# Altium PCB PCB.PcbDoc (part 2 of 3)
Units mm, origin at the board's own origin, x right, y up, seen from the top; angles counter-clockwise.
Board outline 60 x 50 mm, 4 copper layers (Top Layer, Layer 3, Layer 4, Bottom Layer), stack 0.999 mm thick; 112 components, 71 nets, 399 pads, 37 vias.
Unrouted connection lines stored in the file: 18.
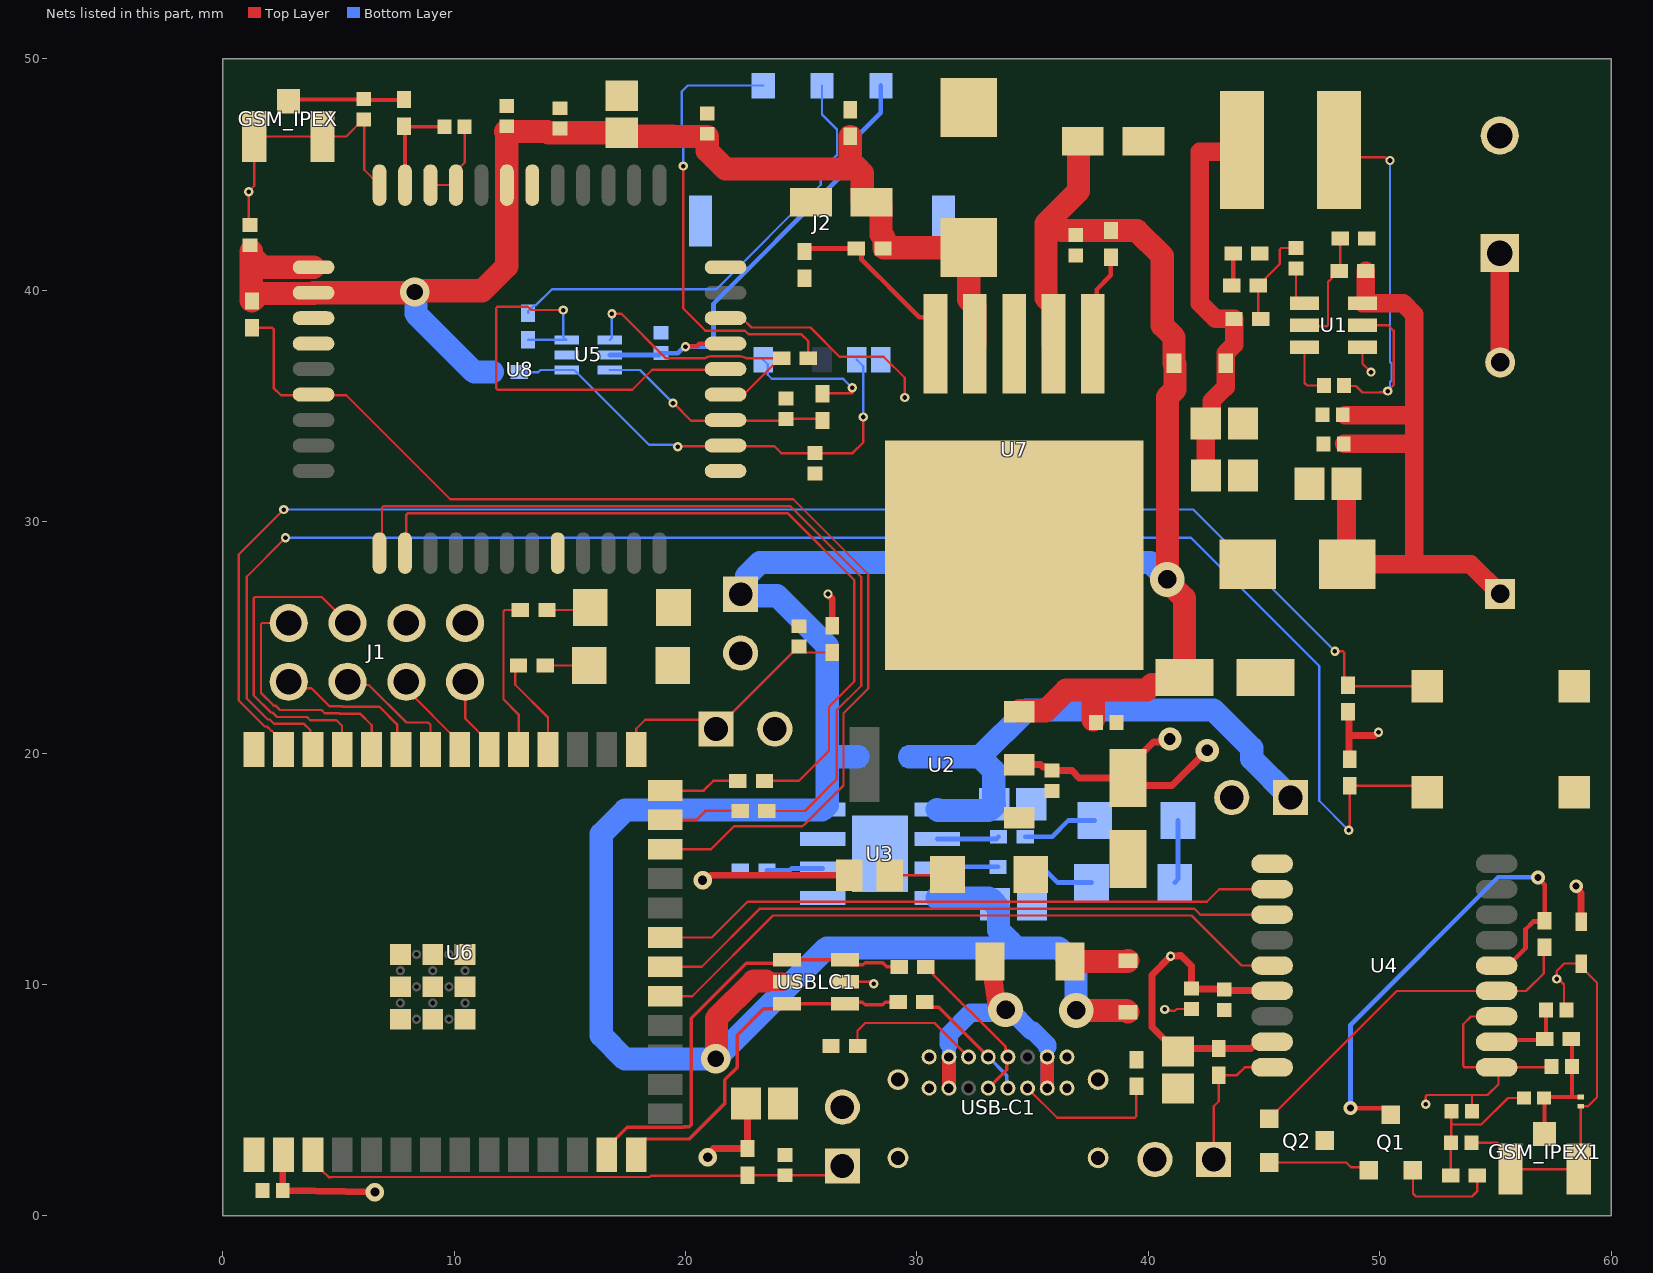
[diagram p4: the nets of this part, all layers, seen from the top]

## Part data (continued)
C22: library part KAM05CT70J475KH, "0402 6.3 V X7T 4.7UF 10%", Device Package="0402 (1005 Metric)", Manufacturer="KYOCERA AVX", Operating Temperature="-55°C ~ 125°C", Ratings=AEC-Q200, Supplier Part Number 1=478-KAM05CT70J475KHCT-ND, Temperature Coefficient=X7T, Tolerance=±10%, Voltage - Rated=6.3V, Applications=Automotive, Capacitance="4.7 µF", ComponentLink1Description=Datasheet, ComponentLink1URL=https://media.digikey.com/pdf/Data%20Sheets/AVX%20PDFs/KAM05CT70J475KH.pdf, ComponentLink2Description="DigiKey Link", ComponentLink2URL=https://www.digikey.com/en/products/detail/kyocera-avx/KAM05CT70J475KH/18685863, lastupdated="06/04/2026 7:09:20 PM", Lifecycle Status=Active, Minimum Order=1, Mounting Type="Surface Mount, MLCC", Package / Case="0402 (1005 Metric)", Packaging=TapeAndReel, Part Number=KAM05CT70J475KH, Part Status=Active, partid=50105, Price=0.05, Series=-, Size / Dimension="0.039\" L x 0.020\" W (1.00mm x 0.50mm)", Supplier 1=DigiKey, Thickness (Max)="0.028\" (0.70mm)"
C23 C24: library part GMC04CG330F50NT, "CAP0402 COG 33PF 1% 50V", Capacitance="33 pF", Part Number=GMC04CG330F50NT
C25 C26: library part GMC04CG470F50NT, "CAP0402 COG 47PF 1% 50V", Device Package="0402 (1005 Metric)", Manufacturer="Cal-Chip Electronics, Inc.", Operating Temperature="-55°C ~ 125°C", Supplier Part Number 1=4713-GMC04CG470F50NTCT-ND, Temperature Coefficient="C0G, NP0", Tolerance=±1%, Voltage - Rated=50V, Applications="General Purpose", Capacitance="47 pF", ComponentLink1Description=Datasheet, ComponentLink1URL=https://calchip.com/wp-content/uploads/2024/02/gmc_series-1.pdf, ComponentLink2Description="DigiKey Link", ComponentLink2URL=https://www.digikey.com/en/products/detail/cal-chip-electronics-inc/GMC04CG470F50NT/22620477, lastupdated="06/04/2026 7:07:18 PM", Lifecycle Status=Active, Minimum Order=1, Mounting Type="Surface Mount, MLCC", Package / Case="0402 (1005 Metric)", Packaging=TapeAndReel, Part Number=GMC04CG470F50NT, partid=63346, Price=0.01, Series=GMC, Size / Dimension="0.039\" L x 0.020\" W (1.00mm x 0.50mm)", Supplier 1=DigiKey, Thickness (Max)="0.022\" (0.55mm)"
C33: library part GMC04CG101F16NT, "CAP0402 COG 100PF 1% 16V", Device Package="0402 (1005 Metric)", Manufacturer="Cal-Chip Electronics, Inc.", Operating Temperature="-55°C ~ 125°C", Supplier Part Number 1=4713-GMC04CG101F16NTCT-ND, Temperature Coefficient="C0G, NP0", Tolerance=±1%, Voltage - Rated=16V, Applications="General Purpose", Capacitance="100 pF", ComponentLink1Description=Datasheet, ComponentLink1URL=https://calchip.com/wp-content/uploads/2024/02/gmc_series-1.pdf, ComponentLink2Description="DigiKey Link", ComponentLink2URL=https://www.digikey.com/en/products/detail/cal-chip-electronics-inc/GMC04CG101F16NT/22577097, lastupdated="06/04/2026 7:07:17 PM", Lifecycle Status=Active, Minimum Order=1, Mounting Type="Surface Mount, MLCC", Package / Case="0402 (1005 Metric)", Packaging=TapeAndReel, Part Number=GMC04CG101F16NT, partid=63248, Price=0.01, Series=GMC, Size / Dimension="0.039\" L x 0.020\" W (1.00mm x 0.50mm)", Supplier 1=DigiKey, Thickness (Max)="0.022\" (0.55mm)"
C34: library part GMC04CG100F16NT, "CAP0402 COG 10PF 1% 16V", Device Package="0402 (1005 Metric)", Manufacturer="Cal-Chip Electronics, Inc.", Operating Temperature="-55°C ~ 125°C", Supplier Part Number 1=4713-GMC04CG100F16NTCT-ND, Temperature Coefficient="C0G, NP0", Tolerance=±1%, Voltage - Rated=16V, Applications="General Purpose", Capacitance="10 pF", ComponentLink1Description=Datasheet, ComponentLink1URL=https://calchip.com/wp-content/uploads/2025/05/GMC-Series-3.pdf, ComponentLink2Description="DigiKey Link", ComponentLink2URL=https://www.digikey.com/en/products/detail/cal-chip-electronics-inc/GMC04CG100F16NT/27783264, Features="General Purpose", lastupdated="06/04/2026 7:06:51 PM", Lifecycle Status=Active, Minimum Order=1, Mounting Type="Surface Mount, MLCC", Package / Case="0402 (1005 Metric)", Packaging=TapeAndReel, Part Number=GMC04CG100F16NT, partid=61390, Price=0.03, Series=GMC, Size / Dimension="0.039\" L x 0.020\" W (1.00mm x 0.50mm)", Supplier 1=DigiKey, Thickness (Max)="0.022\" (0.55mm)"
C36: library part 0402DD105KAT2A, "0402 X5R 1UF10% 35V", Device Package="0402 (1005 Metric)", Manufacturer="KYOCERA AVX", Operating Temperature="-55°C ~ 85°C", Supplier Part Number 1=478-0402DD105KAT2ACT-ND, Temperature Coefficient=X5R, Tolerance=±10%, Voltage - Rated=35V, Applications="General Purpose", Capacitance="1 µF", ComponentLink1Description=Datasheet, ComponentLink1URL=https://datasheets.kyocera-avx.com/cx5r.pdf, ComponentLink2Description="DigiKey Link", ComponentLink2URL=https://www.digikey.com/en/products/detail/kyocera-avx/0402DD105KAT2A/17866333, lastupdated="06/04/2026 7:08:54 PM", Lifecycle Status=Active, Minimum Order=1, Mounting Type="Surface Mount, MLCC", Package / Case="0402 (1005 Metric)", Packaging=TapeAndReel, Part Number=0402DD105KAT2A, Part Status=Active, partid=52378, Price=0.02, Series=-, Size / Dimension="0.039\" L x 0.020\" W (1.00mm x 0.50mm)", Supplier 1=DigiKey
C37: library part TCME337M016R0025E, "330UF (MICRO FARAD)25MOHM @ 100K", Device Package="2917 (7343 Metric)", ESR (Equivalent Series Resistance)="25mOhm @ 100kHz", Lifetime @ Temp.="2000 Hrs @ 125°C", Manufacturer="KYOCERA AVX", Manufacturer Size Code=E, Operating Temperature="-55°C ~ 125°C", Supplier Part Number 1=478-TCME337M016R0025ECT-ND, Tolerance=±20%, Voltage - Rated="16 V", Capacitance="330 µF", ComponentLink1Description=Datasheet, ComponentLink1URL=https://datasheets.kyocera-avx.com/TCM.pdf, ComponentLink2Description="DigiKey Link", ComponentLink2URL=https://www.digikey.com/en/products/detail/kyocera-avx/TCME337M016R0025E/17868563, Features="General Purpose", Height - Seated (Max)="0.169\" (4.30mm)", lastupdated="05/04/2026 8:18:12 PM", Lifecycle Status=Active, Minimum Order=1, Mounting Type="Surface Mount", Package / Case="2917 (7343 Metric)", Packaging=TapeAndReel, Part Number=TCME337M016R0025E, partid=6640, Price=2.44, Series=TCM, Size / Dimension="0.287\" L x 0.169\" W (7.30mm x 4.30mm)", Supplier 1=DigiKey, Type=Molded
D1: "TVS DIODE 15VWM 24.4VC DO214AA", Current - Peak Pulse (10/1000µs)=24.6A, Manufacturer="Littelfuse Inc.", Operating Temperature="-65°C ~ 150°C (TJ)", Package / Case="DO-214AA, SMB", Power - Peak Pulse=600W, Power Line Protection=No, Supplier Device Package="DO-214AA (SMBJ)", Supplier Part Number 1=SMBJ15CALFCT-ND, Voltage - Breakdown (Min)=16.7V, Voltage - Clamping (Max) @ Ipp=24.4V, Voltage - Reverse Standoff (Typ)=15V, Applications="General Purpose", Bidirectional Channels=1, ComponentLink1Description=Datasheet, ComponentLink1URL=https://www.littelfuse.com/~/media/electronics/datasheets/tvs_diodes/littelfuse_tvs_diode_smbj_datasheet.pdf.pdf, ComponentLink2Description="DigiKey Link", ComponentLink2URL=https://www.digikey.com/en/products/detail/littelfuse-inc/SMBJ15CA/285982, lastupdated="05/04/2026 9:01:04 PM", Lifecycle Status=Active, Minimum Order=1, Mounting Type="Surface Mount", Packaging=TapeAndReel, Part Number=SMBJ15CA, Part Status=Active, partid=9087, Price=0.07, Series=SMBJ, Supplier 1=DigiKey, Type=Zener
D2 D6 D7: library part SML-LX1206SRC-TR, "LED RED CLEAR 1206 SMD", Current - Test=20mA, Device Package="1206 (3216 Metric)", Lens Color=Colorless, Manufacturer="Lumex Opto/Components Inc.", Millicandela Rating=25mcd, Supplier Device Package=1206, Supplier Part Number 1=67-1359-1-ND, Voltage - Forward (Vf) (Typ)=1.7V, Color=Red, ComponentLink1Description=Datasheet, ComponentLink1URL=//media.digikey.com/pdf/Data%20Sheets/Lumex%20PDFs/SML-LX1206SRC-TR.pdf, ComponentLink2Description="DigiKey Link", ComponentLink2URL=https://www.digikey.com/en/products/detail/lumex-opto-components-inc/SML-LX1206SRC-TR/229141, Configuration=Standard, Height (Max)=1.10mm, lastupdated="05/04/2026 8:39:22 PM", Lens Size="2.00mm x 1.50mm", Lens Style="Rectangle with Flat Top", Lens Transparency=Clear, Lifecycle Status=Active, Minimum Order=1, Mounting Type="Surface Mount", Package / Case="1206 (3216 Metric)", Packaging=TapeAndReel, Part Number=SML-LX1206SRC-TR, Part Status=Active, partid=224, Price=0.07, Series=-, Size / Dimension="3.20mm L x 1.60mm W", Supplier 1=DigiKey, Viewing Angle=140°, Wavelength - Peak=660nm
D3: library part IN-S126ATG, "LED GREEN CLEAR 1206 SMD", Current - Test=20mA, Device Package="1206 (3216 Metric)", Lens Color=Colorless, Manufacturer=Inolux, Millicandela Rating=560mcd, Supplier Device Package=1206, Supplier Part Number 1=1830-1089-1-ND, Voltage - Forward (Vf) (Typ)=3.2V, Color=Green, ComponentLink1Description=Datasheet, ComponentLink1URL=http://www.inolux-corp.com/datasheet/SMDLED/Mono%20Color%20Top%20View/IN-S126AT%20Series_V1.0.pdf, ComponentLink2Description="DigiKey Link", ComponentLink2URL=https://www.digikey.com/en/products/detail/inolux/IN-S126ATG/7604905, Configuration=Standard, Height (Max)=1.10mm, lastupdated="05/04/2026 8:37:03 PM", Lens Size="2.00mm x 1.50mm", Lens Style="Rectangle with Flat Top", Lens Transparency=Clear, Lifecycle Status=Active, Minimum Order=1, Mounting Type="Surface Mount", Package / Case="1206 (3216 Metric)", Packaging=TapeAndReel, Part Number=IN-S126ATG, Part Status=Active, partid=552, Price=0.06, Series=IN-S126AT, Size / Dimension="3.20mm L x 1.50mm W", Supplier 1=DigiKey, Viewing Angle=120°, Wavelength - Dominant=520nm, Wavelength - Peak=526nm
D4 D5 D8: library part CMP-1055-00466-1, "Schottky Barrier Diode, 2-Pin SOD-323, Pb-Free, Tape and Reel", Manufacturer="On Semiconductor", ComponentLink1Description="Manufacturer URL", ComponentLink1URL=http://www.onsemi.com/, ComponentLink2Description=Datasheet, ComponentLink2URL=http://www.onsemi.cn/pub_link/Collateral/NSR0320MW2T1-D.PDF, ComponentLink3Description="Package Specification", ComponentLink3URL=http://www.onsemi.com/pub_link/Collateral/477-02.PDF.1, Configuration=Single, DatasheetVersion="Rev. 4", IFSM Max (A)=5, Mounting Technology="Surface Mount", PackageDescription="2-Pin SOD, Body 1.7 x 1.25 mm", PackageReference=SOD-323-2-477-02, PackageVersion="Rev. H, 03/2007", Packing="Tape and Reel", PartNumber=NSR0320MW2T1G, RoHS=TRUE
D9: "TVS DIODE 5VWM 11VC DSN0603-2", Part Number=PESD5V0S1USF,315
D10: "TVS DIODE 3.3VWM 14.1VC SOD523", Part Number=ESD5Z3.3T5G
D11: library part CMD11-21VYC/TR8, "LED YELLOW CLEAR 1206 SMD", Current - Test=20mA, Device Package="1206 (3216 Metric)", Lens Color=1.50mm, Manufacturer="Visual Communications Company - VCC", Millicandela Rating=6mcd, Supplier Device Package=1206, Supplier Part Number 1=28-CMD11-21VYC/TR8CT-ND, Voltage - Forward (Vf) (Typ)=2V, Color=Yellow, ComponentLink1Description=Datasheet, ComponentLink1URL=https://vcclite.com/wp-content/uploads/wpallimport/files/files/CMD11-21%20SMT%20LEDs%201206%20Package%20Size.pdf, ComponentLink2Description="DigiKey Link", ComponentLink2URL=https://www.digikey.com/en/products/detail/visual-communications-company-vcc/CMD11-21VYC-TR8/254830, Configuration=Standard, Height (Max)=1.50mm, lastupdated="05/04/2026 8:40:44 PM", Lens Size="1.10mm Dia", Lens Style="Round with Flat Top", Lens Transparency=Clear, Lifecycle Status=Active, Minimum Order=1, Mounting Type="Surface Mount", Package / Case="1206 (3216 Metric)", Packaging=TapeAndReel, Part Number=CMD11-21VYC/TR8, Part Status=Active, partid=6, Price=0.25, Series=-, Size / Dimension="3.00mm L x 1.50mm W", Supplier 1=DigiKey, Viewing Angle=20°, Wavelength - Peak=585nm
F1: "FUSE BOARD MNT 750MA 63VDC 1206", Breaking Capacity @ Rated Voltage=50A, Current Rating (Amps)=750mA, Device Package="1206 (3216 Metric)", Manufacturer="Vishay Beyschlag", Operating Temperature="-55°C ~ 125°C", Supplier Part Number 1=MFU1206.75CT-ND, Voltage Rating - DC=63V, Approval Agency=UL, Approvals=UL, ComponentLink1Description=Datasheet, ComponentLink1URL=http://www.vishay.com/docs/28747/mfuserie.pdf, ComponentLink2Description="DigiKey Link", ComponentLink2URL=http://digikey.com/product-detail/en/vishay-beyschlag/MFU1206FF00750P100/MFU1206.75CT-ND/1206559, Fuse Type="Board Mount (Cartridge Style Excluded)", lastupdated="02/09/2020 1:30:46 AM", Lifecycle Status=Active, Melting I²t=0.0022, Minimum Order=1, Mounting Type="Surface Mount", Package / Case="1206 (3216 Metric)", Packaging=TapeAndReel, Part Number=MFU1206FF00750P100, Part Status=Active, Price=0.40, Response Time="Fast Blow", Series=MFU, Size / Dimension="0.126\" L x 0.063\" W x 0.022\" H (3.20mm x 1.60mm x 0.55mm)", Supplier 1=DigiKey
F2: library part CMP-08605-000087-1, "FUSE BRD MNT 3A 125VAC/VDC RAD", Case/Package=Radial, Current Rating=3A, DC Cold Resistance=275mR, Max Operating Temperature=90°C, Min Operating Temperature=-55°C, Package Quantity=1000, Voltage Rating (AC)=125V, Approvals=UR, Fuse Current=3A, Height=8mm, Length=0.512inch, Mount="Through Hole", Packaging=Bulk, REACH SVHC="No SVHC", Resistance=275mR, RoHS Compliant=Yes, Series="PICO® 259-UL913", Termination=Radial, Type=Electrical, Voltage Rating (DC)=125V, Width=8mm
GSM_IPEX GSM_IPEX1: library part CMP-2000-05152-3, "CONN U.FL RCPT STR 50 OHM SMD", Dielectric Material=Polymer, Frequency=6GHz, Housing Color=Beige, Insulation Resistance=500MR, Max Operating Temperature=90°C, Min Operating Temperature=-40°C, Package Quantity=2500, Body Material=Bronze, Body Plating=Silver, Connector Type=Coaxial, Contact Material=Brass, Contact Plating=Gold, Depth=3.1mm, Fastening Type=Snap, Gender=Male, Impedance=50R, Lead Free="Lead Free", Length=3mm, Max Frequency=6GHz, Mount="Surface Mount", Orientation=Straight, Packaging="Cut Tape", Radiation Hardening=No, REACH SVHC="No SVHC", Series=U.FL, Termination=Solder, Weight=0.001764oz, Wire/Cable Type=Coaxial
J1: library part 6130XX21121_61300821121, "Connector Header Through Hole 8 position 0.100 (2.54mm)", Package=None, Check_prices=https://www.snapeda.com/parts/61300821121/Wurth+Electronics/view-part/?ref=eda, MF="Wurth Electronics", MP=61300821121, SnapEDA_Link=https://www.snapeda.com/parts/61300821121/Wurth+Electronics/view-part/?ref=snap
J2: "8 (6 + 2) Position Card Connector NANO SIM Surface Mount, Right Angle Gold", Package=None, Availability="In Stock", Check_prices=https://www.snapeda.com/parts/2452808-1/TE+Connectivity/view-part/?ref=eda, MF="TE Connectivity", MP=2452808-1, Price=None, SnapEDA_Link=https://www.snapeda.com/parts/2452808-1/TE+Connectivity/view-part/?ref=snap
L1: library part VLS6045EX-100M, "FIXED IND 10UH 3.4A 61 MOHM SMD", Current - Saturation=3.9A, Current Rating (Amps)="3.4 A", DC Resistance (DCR)=47mOhm, Device Package=Nonstandard, Inductance Frequency - Test="100 kHz", Manufacturer="TDK Corporation", Operating Temperature="-40°C ~ 105°C", Supplier Part Number 1=445-173039-1-ND, Tolerance=±20%, ComponentLink1Description=Datasheet, ComponentLink1URL=https://product.tdk.com/info/en/catalog/datasheets/inductor_commercial_power_vls6045ex_en.pdf?ref_disty=digikey, ComponentLink2Description="DigiKey Link", ComponentLink2URL=https://www.digikey.com/en/products/detail/tdk-corporation/VLS6045EX-100M/5057822, Height - Seated (Max)="0.177\" (4.50mm)", Inductance="10 µH", lastupdated="20/05/2026 2:30:18 PM", Lifecycle Status=Active, Material - Core=Ferrite, Minimum Order=1, Mounting Type="Surface Mount", Package / Case=Nonstandard, Packaging=TapeAndReel, Part Number=VLS6045EX-100M, Part Status=Active, partid=8938, Price=0.14, Series=VLS-EX, Shielding=Shielded, Size / Dimension="0.236\" L x 0.236\" W (6.00mm x 6.00mm)", Supplier 1=DigiKey, Type="Drum Core, Wirewound"
L2: library part CMP-06042-003943-1, "Multilayer type RF Inductor 47nH ±5% 0.72Ω 300mA 0402"
P1: library part "Bornier 2 vis 5.08mm", "Terminal Block Connector Wire Receptacle 2 5.08 mm 30-16 AWG Green 13.5 A 250 V", Package=None, Availability="In Stock", Check_prices=https://www.snapeda.com/parts/282837-2/TE+Connectivity+AMP+Connectors/view-part/?ref=eda, MF="TE Connectivity", MP=282837-2, Price=None, Purchase-URL="https://www.snapeda.com/api/url_track_click_mouser/?unipart_id=2549980&manufacturer=TE Connectivity&part_name=282837-2&search_term=bornier 2 vis 5.08mm", SnapEDA_Link=https://www.snapeda.com/parts/282837-2/TE+Connectivity+AMP+Connectors/view-part/?ref=snap
P2 P3 P4 P5 P6: library part CMP-1024-00064-1, "Low Profile .025\" SQ Post Header, Through-hole, Vertical, -55 to 125 degC, 2.54 mm Pitch, 2-Pin, Male, RoHS", Manufacturer=Samtec, Temperature Range="-55 to 125 degC", ComponentLink1Description="Manufacturer URL", ComponentLink1URL=http://www.samtec.com, ComponentLink2Description=Datasheet, ComponentLink2URL=http://www.samtec.com/documents/webfiles/pdf/MTLW_TH.PDF, ComponentLink3Description="Package Specification", ComponentLink3URL=http://www.samtec.com/documents/webfiles/cpdf/MTLW-1XX-XX-XX-X-XXX-XX-XX-MKT1.pdf, DatasheetVersion=F-214, Mounting Technology=Through-hole, Orientation=Vertical, PackageDescription="Low Profile Terminal Assembly", PackageReference=MTLW-102-05-X-S-172, PackageVersion="T, 6/1991", PartNumber=MTLW-102-05-G-S-172, Pitch="2.54 mm", RoHS=True
Q1: library part CMP-2000-05778-1, "P-Channel MOSFET, 30 V, 4 A, -55 to 150 degC, 3-Pin SOT-23-3L, RoHS, Tape and Reel", Continuous Drain Current=4A, Drain-Source On-Volt=30V, Frequency (Max)=NotRequiredMHz, Gate-Source Voltage (Max)=?12V, Manufacturer="Alpha and Omega", Operating Temp Range=-55Cto150C, Operating Temperature Classification=Military, Output Power (Max)=NotRequiredW, Package Description="3-Pin Small Outline Transistor, Body 2.95 x 1.6 mm, Pitch 0.95 mm", Package Reference=SOT-23-3L, Package Type=SOT-23, Power Dissipation=1.4W, Power Gain=NotRequireddB, Channel Mode=Enhancement, Datasheet URL=http://www.aosmd.com/res/data_sheets/AO3401A.pdf, Datasheet Version="Rev. 3, 03/2011", Drain Current (Max)=4A, Drain Efficiency=NotRequired%, Drain-Source On-Res=0.044ohm, Manufacturer URL=http://www.aosmd.com/, Mounting=SurfaceMount, Mounting Technology=SurfaceMount, Noise Figure=NotRequireddB, Number of  Elements=1, Package URL=http://www.aosmd.com/res/packaging_information/SOT-23-3L.pdf, Pin Count=3, Polarity=P, Rad Hardened=No, Type=PowerMOSFET
Q2: library part CMP-83955-000006-1, "MOSFET N-CH 30V 5.7A SOT23", Case/Package=SOT-23, Continuous Drain Current (ID)=5.7A, Drain to Source Voltage (Vdss)=30V, Gate to Source Voltage (Vgs)=12V, Input Capacitance=630pF, Max Operating Temperature=150°C, Max Power Dissipation=1.4W, Min Operating Temperature=-55°C, Lead Free="Lead Free", Mount="Surface Mount", Number of Elements=1, Number of Pins=3, Packaging="Tape and Reel", Power Dissipation=1.4W, Radiation Hardening=No, Rds On Max=26.5mR
R1 R2 R3 R12 R19 R27 R30 R31: library part TNPU040210K0BZEP00, "TNPU0402 10K 0.1% T-16 EP1 E3", Device Package="0402 (1005 Metric)", Manufacturer="Vishay Dale", Operating Temperature="-55°C ~ 125°C", Power (Watts)="0.063W, 1/16W", Ratings=AEC-Q200, Supplier Device Package=0402, Supplier Part Number 1=541-TNPU040210K0BZEP00CT-ND, Temperature Coefficient=±5ppm/°C, Tolerance=±0.1%, ComponentLink1Description=Datasheet, ComponentLink1URL=http://www.vishay.com/docs/28779/tnpue3.pdf, ComponentLink2Description="DigiKey Link", ComponentLink2URL=https://www.digikey.com/en/products/detail/vishay-dale/TNPU040210K0BZEP00/10668512, Composition="Thin Film", Features="Anti-Sulfur, Automotive AEC-Q200, Moisture Resistant", Height - Seated (Max)="0.016\" (0.40mm)", lastupdated="09/02/2024 8:29:39 PM", Lifecycle Status=Active, Minimum Order=1, Number of Terminations=2, Package / Case="0402 (1005 Metric)", Packaging=TapeAndReel, Part Number=TNPU040210K0BZEP00, Part Status=Active, partid=49938, Price=0.67, Resistance="10 kOhms", Series="TNPU e3", Size / Dimension="0.039\" L x 0.020\" W (1.00mm x 0.50mm)", Supplier 1=DigiKey
R4: library part CPF0402B511KE1, "CPF 0402 511K 0.1% 25PPM 1K RL", Device Package="0402 (1005 Metric)", Manufacturer="TE Connectivity Passive Product", Operating Temperature="-55°C ~ 155°C", Power (Watts)="0.063W, 1/16W", Supplier Device Package=0402, Supplier Part Number 1=1712-CPF0402B511KE1CT-ND, Temperature Coefficient=±25ppm/°C, Tolerance=±0.1%, ComponentLink1Description=Datasheet, ComponentLink1URL=https://www.te.com/commerce/DocumentDelivery/DDEController?Action=srchrtrv&DocNm=1773200&DocType=DS&DocLang=English, ComponentLink2Description="DigiKey Link", ComponentLink2URL=https://www.digikey.com/en/products/detail/te-connectivity-passive-product/CPF0402B511KE1/14007317, Composition="Thin Film", Height - Seated (Max)="0.014\" (0.35mm)", lastupdated="09/02/2024 8:29:08 PM", Lifecycle Status=Active, Minimum Order=1, Number of Terminations=2, Package / Case="0402 (1005 Metric)", Packaging=TapeAndReel, Part Number=CPF0402B511KE1, Part Status=Active, partid=60347, Price=0.13, Resistance="511 kOhms", Series=CPF, Size / Dimension="0.039\" L x 0.020\" W (1.00mm x 0.50mm)", Supplier 1=DigiKey
R5: library part RG1005N-49R9-W-T1, "RES SMD 49.9OHM 0.05% 1/16W 0402", Device Package="0402 (1005 Metric)", Manufacturer=Susumu, Operating Temperature="-55°C ~ 155°C", Power (Watts)="0.063W, 1/16W", Ratings=AEC-Q200, Supplier Device Package=0402, Supplier Part Number 1=408-RG1005N-49R9-W-T1CT-ND, Temperature Coefficient=±10ppm/°C, Tolerance=±0.05%, ComponentLink1Description=Datasheet, ComponentLink1URL=https://mm.digikey.com/Volume0/opasdata/d220001/medias/docus/1162/RG_RM_RGH_Oct2012.pdf, ComponentLink2Description="DigiKey Link", ComponentLink2URL=https://www.digikey.com/en/products/detail/susumu/RG1005N-49R9-W-T1/1251533, Composition="Thin Film", Features="Anti-Sulfur, Automotive AEC-Q200", Height - Seated (Max)="0.016\" (0.40mm)", lastupdated="09/02/2024 8:28:25 PM", Lifecycle Status=Active, Minimum Order=1, Number of Terminations=2, Package / Case="0402 (1005 Metric)", Packaging=TapeAndReel, Part Number=RG1005N-49R9-W-T1, partid=81673, Price=0.41, Resistance="49.9 Ohms", Series=RG, Size / Dimension="0.039\" L x 0.020\" W (1.00mm x 0.50mm)", Supplier 1=DigiKey
R6: library part RL1220S-R33-F, "RES 0.33 OHM 1% 1/3W 0805", Device Package="0805 (2012 Metric)", Manufacturer=Susumu, Operating Temperature="-55°C ~ 125°C", Power (Watts)="0.333W, 1/3W", Supplier Device Package=0805, Supplier Part Number 1=RL12S.33FCT-ND, Temperature Coefficient="0/ +200ppm/°C", Tolerance=±1%, ComponentLink1Description=Datasheet, ComponentLink1URL=http://www.susumu.co.jp/common/pdf/n_catalog_partition08_en.pdf, ComponentLink2Description="DigiKey Link", ComponentLink2URL=https://www.digikey.com/en/products/detail/susumu/RL1220S-R33-F/432488, Composition="Thin Film", Features="Current Sense", Height - Seated (Max)="0.020\" (0.50mm)", lastupdated="05/04/2026 8:11:25 PM", Lifecycle Status=Active, Minimum Order=1, Number of Terminations=2, Package / Case="0805 (2012 Metric)", Packaging=TapeAndReel, Part Number=RL1220S-R33-F, Part Status=Active, partid=28048, Price=0.03, Resistance="330 mOhms", Series=RL, Size / Dimension="0.079\" L x 0.049\" W (2.00mm x 1.25mm)", Supplier 1=DigiKey
R7: library part CPF0402B105KE1, "RES 105 KOHM 0.1% 1/16W 0402", Device Package="0402 (1005 Metric)", Manufacturer="TE Connectivity Passive Product", Operating Temperature="-55°C ~ 155°C", Power (Watts)="0.063W, 1/16W", Supplier Device Package=0402, Supplier Part Number 1=1712-CPF0402B105KE1CT-ND, Temperature Coefficient=±25ppm/°C, Tolerance=±0.1%, ComponentLink2Description="DigiKey Link", ComponentLink2URL=https://www.digikey.com/en/products/detail/te-connectivity-passive-product/CPF0402B105KE1/7493534, Composition="Thin Film", Height - Seated (Max)="0.014\" (0.35mm)", lastupdated="09/02/2024 8:28:39 PM", Lifecycle Status=Active, Minimum Order=1, Number of Terminations=2, Package / Case="0402 (1005 Metric)", Packaging=TapeAndReel, Part Number=CPF0402B105KE1, Part Status=Active, partid=75075, Price=0.14, Resistance="105 kOhms", Series="CPF, Neohm", Size / Dimension="0.039\" L x 0.020\" W (1.00mm x 0.50mm)", Supplier 1=DigiKey
R8: library part RCG040278K7FKED, "RCG0402 100 78K7 1% ED", Device Package="0402 (1005 Metric)", Manufacturer="Vishay Dale", Operating Temperature="-55°C ~ 155°C", Power (Watts)="0.063W, 1/16W", Supplier Device Package=0402, Supplier Part Number 1=541-RCG040278K7FKEDCT-ND, Temperature Coefficient=±100ppm/°C, Tolerance=±1%, ComponentLink1Description=Datasheet, ComponentLink1URL=https://www.vishay.com/docs/20047/rcge3.pdf, ComponentLink2Description="DigiKey Link", ComponentLink2URL=https://www.digikey.com/en/products/detail/vishay-dale/RCG040278K7FKED/13212793, Composition="Thick Film", Height - Seated (Max)="0.016\" (0.40mm)", lastupdated="09/02/2024 8:28:55 PM", Lifecycle Status=Active, Minimum Order=1, Number of Terminations=2, Package / Case="0402 (1005 Metric)", Packaging=TapeAndReel, Part Number=RCG040278K7FKED, Part Status=Active, partid=64828, Price=0.01, Resistance="78.7 kOhms", Series="RCG e3", Size / Dimension="0.039\" L x 0.020\" W (1.00mm x 0.50mm)", Supplier 1=DigiKey
R9: library part RQ73C1E13K3BTD, "RES 13.3 KOHMS 0.1% 1/16W 0402", Device Package="0402 (1005 Metric)", Manufacturer="TE Connectivity Passive Product", Operating Temperature="-55°C ~ 155°C", Power (Watts)="0.063W, 1/16W", Ratings=AEC-Q200, Supplier Device Package=0402, Supplier Part Number 1=A140120CT-ND, Temperature Coefficient=±10ppm/°C, Tolerance=±0.1%, ComponentLink1Description=Datasheet, ComponentLink1URL=//media.digikey.com/pdf/Data%20Sheets/Tyco%20Electronics%20P%20B%20PDFs/RQ73-0618%20v2.pdf, ComponentLink2Description="DigiKey Link", ComponentLink2URL=https://www.digikey.com/en/products/detail/te-connectivity-passive-product/RQ73C1E13K3BTD/9480068, Composition="Thin Film", Features="Anti-Sulfur, Automotive AEC-Q200", Height - Seated (Max)="0.016\" (0.40mm)", lastupdated="09/02/2024 8:29:13 PM", Lifecycle Status=Active, Minimum Order=1, Number of Terminations=2, Package / Case="0402 (1005 Metric)", Packaging=TapeAndReel, Part Number=RQ73C1E13K3BTD, Part Status=Active, partid=21943, Price=0.27, Resistance="13.3 kOhms", Series=RQ73, Size / Dimension="0.039\" L x 0.020\" W (1.00mm x 0.50mm)", Supplier 1=DigiKey
R10 R11 R13 R17 R21 R22 R32: library part TNPU04021K00BZEP00, "TNPU0402 1K0 0.1% T-16 EP1 E3", Device Package="0402 (1005 Metric)", Manufacturer="Vishay Dale", Operating Temperature="-55°C ~ 125°C", Power (Watts)="0.063W, 1/16W", Ratings=AEC-Q200, Supplier Device Package=0402, Supplier Part Number 1=541-TNPU04021K00BZEP00CT-ND, Temperature Coefficient=±5ppm/°C, Tolerance=±0.1%, ComponentLink1Description=Datasheet, ComponentLink1URL=http://www.vishay.com/docs/28779/tnpue3.pdf, ComponentLink2Description="DigiKey Link", ComponentLink2URL=https://www.digikey.com/en/products/detail/vishay-dale/TNPU04021K00BZEP00/10668523, Composition="Thin Film", Features="Anti-Sulfur, Automotive AEC-Q200, Moisture Resistant", Height - Seated (Max)="0.016\" (0.40mm)", lastupdated="09/02/2024 8:29:39 PM", Lifecycle Status=Active, Minimum Order=1, Number of Terminations=2, Package / Case="0402 (1005 Metric)", Packaging=TapeAndReel, Part Number=TNPU04021K00BZEP00, Part Status=Active, partid=49940, Price=0.67, Resistance="1 kOhms", Series="TNPU e3", Size / Dimension="0.039\" L x 0.020\" W (1.00mm x 0.50mm)", Supplier 1=DigiKey
R14 R15 R16: library part CR0402-JW-510GLF, "RES SMD 51 OHM 5% 1/16W 0402", Device Package="0402 (1005 Metric)", Manufacturer="Bourns Inc.", Operating Temperature="-55°C ~ 155°C", Power (Watts)="0.063W, 1/16W", Supplier Device Package=0402, Supplier Part Number 1=CR0402-JW-510GLFCT-ND, Temperature Coefficient=±200ppm/°C, Tolerance=±5%, ComponentLink1Description=Datasheet, ComponentLink1URL=https://www.bourns.com/docs/Product-Datasheets/CR0402.pdf, ComponentLink2Description="DigiKey Link", ComponentLink2URL=https://www.digikey.com/en/products/detail/bourns-inc/CR0402-JW-510GLF/3783623, Composition="Thick Film", Height - Seated (Max)="0.016\" (0.40mm)", lastupdated="09/02/2024 8:29:49 PM", Lifecycle Status=Active, Minimum Order=1, Number of Terminations=2, Package / Case="0402 (1005 Metric)", Packaging=CutTape, Part Number=CR0402-JW-510GLF, Part Status=Active, partid=12185, Price=0.01, Resistance="51 Ohms", Series=CR0402, Size / Dimension="0.039\" L x 0.020\" W (1.00mm x 0.50mm)", Supplier 1=DigiKey
R18: library part NT0402BRD074K7L, "RES THIN FILM 0.10% 1/20W 4.7K", Device Package="0402 (1005 Metric)", Manufacturer=Yageo, Operating Temperature="-55°C ~ 155°C", Power (Watts)="0.05W, 1/20W", Ratings=AEC-Q200, Supplier Device Package=0402, Supplier Part Number 1=13-NT0402BRD074K7LCT-ND, Temperature Coefficient=±25ppm/°C, Tolerance=±0.1%, ComponentLink1Description=Datasheet, ComponentLink1URL=https://www.yageo.com/upload/media/product/productsearch/datasheet/rchip/PYu-NT_51_RoHS_L_0.pdf, ComponentLink2Description="DigiKey Link", ComponentLink2URL=https://www.digikey.com/en/products/detail/yageo/NT0402BRD074K7L/22206010, Composition="Thin Film", Features="Anti-Sulfur, Automotive AEC-Q200", Height - Seated (Max)="0.014\" (0.35mm)", lastupdated="06/04/2026 7:40:36 PM", Lifecycle Status=Active, Minimum Order=1, Number of Terminations=2, Package / Case="0402 (1005 Metric)", Packaging=TapeAndReel, Part Number=NT0402BRD074K7L, partid=85342, Price=0.17, Resistance="4.7 kOhms", Series=NT, Size / Dimension="0.039\" L x 0.020\" W (1.00mm x 0.50mm)", Supplier 1=DigiKey
R20 R29: library part CR0402AJ/-000GAS, "RESA-AS 0402 0R JUMPER 63MW", Part Number=CR0402AJ/-000GAS
R23 R24: library part TNPU04025K10BZEP00, "TNPU0402 5K1 0.1% T-16 EP1 E3", Device Package="0402 (1005 Metric)", Manufacturer="Vishay Dale", Operating Temperature="-55°C ~ 125°C", Power (Watts)="0.063W, 1/16W", Ratings=AEC-Q200, Supplier Device Package=0402, Supplier Part Number 1=541-TNPU04025K10BZEP00CT-ND, Temperature Coefficient=±5ppm/°C, Tolerance=±0.1%, ComponentLink1Description=Datasheet, ComponentLink1URL=https://www.vishay.com/docs/28779/tnpue3.pdf, ComponentLink2Description="DigiKey Link", ComponentLink2URL=https://www.digikey.com/en/products/detail/vishay-dale/TNPU04025K10BZEP00/13930447, Composition="Thin Film", Features="Anti-Sulfur, Automotive AEC-Q200, Moisture Resistant", Height - Seated (Max)="0.016\" (0.40mm)", lastupdated="09/02/2024 8:28:37 PM", Lifecycle Status=Active, Minimum Order=1, Number of Terminations=2, Package / Case="0402 (1005 Metric)", Packaging=TapeAndReel, Part Number=TNPU04025K10BZEP00, Part Status=Active, partid=74902, Price=0.67, Resistance="5.1 kOhms", Series="TNPU e3", Size / Dimension="0.039\" L x 0.020\" W (1.00mm x 0.50mm)", Supplier 1=DigiKey
R25 R26: library part RC0402FR-7W22RL, "RES 22 OHM 1% 1/8W 0402", Device Package="0402 (1005 Metric)", Manufacturer=Yageo, Operating Temperature="-55°C ~ 155°C", Power (Watts)="0.125W, 1/8W", Supplier Device Package=0402, Supplier Part Number 1=13-RC0402FR-7W22RLCT-ND, Temperature Coefficient=±200ppm/°C, Tolerance=±1%, ComponentLink1Description=Datasheet, ComponentLink1URL=https://www.yageo.com/upload/media/product/products/datasheet/rchip/PYu-RC_Group_51_RoHS_L_12.pdf, ComponentLink2Description="DigiKey Link", ComponentLink2URL=https://www.digikey.com/en/products/detail/yageo/RC0402FR-7W22RL/17013613, Composition="Thick Film", Features="Moisture Resistant", Height - Seated (Max)="0.016\" (0.40mm)", lastupdated="06/04/2026 7:40:17 PM", Lifecycle Status=Active, Minimum Order=1, Number of Terminations=2, Package / Case="0402 (1005 Metric)", Packaging=CutTape, Part Number=RC0402FR-7W22RL, partid=90516, Price=0.01, Resistance="22 Ohms", Series=RC_L, Size / Dimension="0.039\" L x 0.020\" W (1.00mm x 0.50mm)", Supplier 1=DigiKey
R28: library part TNPU040210K0BZEP00, "TNPU0402 10K 0.1% T-16 EP1 E3", Device Package="0402 (1005 Metric)", Manufacturer="Vishay Dale", Operating Temperature="-55°C ~ 125°C", Power (Watts)="0.063W, 1/16W", Ratings=AEC-Q200, Resistance="10 kOhms", Supplier Device Package=0402, Supplier Part Number 1=541-TNPU040210K0BZEP00CT-ND, Temperature Coefficient=±5ppm/°C, Tolerance=±0.1%, ComponentLink1Description=Datasheet, ComponentLink1URL=http://www.vishay.com/docs/28779/tnpue3.pdf, ComponentLink2Description="DigiKey Link", ComponentLink2URL=https://www.digikey.com/en/products/detail/vishay-dale/TNPU040210K0BZEP00/10668512, Composition="Thin Film", Features="Anti-Sulfur, Automotive AEC-Q200, Moisture Resistant", Height - Seated (Max)="0.016\" (0.40mm)", lastupdated="09/02/2024 8:29:39 PM", Lifecycle Status=Active, Minimum Order=1, Number of Terminations=2, Package / Case="0402 (1005 Metric)", Packaging=TapeAndReel, Part Number=TNPU040210K0BZEP00, Part Status=Active, partid=49938, Price=0.67, Series="TNPU e3", Size / Dimension="0.039\" L x 0.020\" W (1.00mm x 0.50mm)", Supplier 1=DigiKey
R33: library part TNPU0402100KBZEP00, "TNPU0402 100K 0.1% T-16 EP1 E3", Device Package="0402 (1005 Metric)", Manufacturer="Vishay Dale", Operating Temperature="-55°C ~ 125°C", Power (Watts)="0.063W, 1/16W", Ratings=AEC-Q200, Supplier Device Package=0402, Supplier Part Number 1=541-TNPU0402100KBZEP00CT-ND, Temperature Coefficient=±5ppm/°C, Tolerance=±0.1%, ComponentLink1Description=Datasheet, ComponentLink1URL=http://www.vishay.com/docs/28779/tnpue3.pdf, ComponentLink2Description="DigiKey Link", ComponentLink2URL=https://www.digikey.com/en/products/detail/vishay-dale/TNPU0402100KBZEP00/10668520, Composition="Thin Film", Features="Anti-Sulfur, Automotive AEC-Q200, Moisture Resistant", Height - Seated (Max)="0.016\" (0.40mm)", lastupdated="09/02/2024 8:29:39 PM", Lifecycle Status=Active, Minimum Order=1, Number of Terminations=2, Package / Case="0402 (1005 Metric)", Packaging=TapeAndReel, Part Number=TNPU0402100KBZEP00, Part Status=Active, partid=49945, Price=0.67, Resistance="100 kOhms", Series="TNPU e3", Size / Dimension="0.039\" L x 0.020\" W (1.00mm x 0.50mm)", Supplier 1=DigiKey
R34: library part CR0402-JW-471GLF, "RES SMD 470 OHM 5% 1/16W 0402", Device Package="0402 (1005 Metric)", Manufacturer="Bourns Inc.", Operating Temperature="-55°C ~ 155°C", Power (Watts)="0.063W, 1/16W", Supplier Device Package=0402, Supplier Part Number 1=CR0402-JW-471GLFCT-ND, Temperature Coefficient=±200ppm/°C, Tolerance=±5%, ComponentLink1Description=Datasheet, ComponentLink1URL=https://www.bourns.com/docs/Product-Datasheets/CR0402.pdf, ComponentLink2Description="DigiKey Link", ComponentLink2URL=https://www.digikey.com/en/products/detail/bourns-inc/CR0402-JW-471GLF/3783619, Composition="Thick Film", Height - Seated (Max)="0.016\" (0.40mm)", lastupdated="09/02/2024 8:29:41 PM", Lifecycle Status=Active, Minimum Order=1, Number of Terminations=2, Package / Case="0402 (1005 Metric)", Packaging=CutTape, Part Number=CR0402-JW-471GLF, Part Status=Active, partid=15140, Price=0.01, Resistance="470 Ohms", Series=CR0402, Size / Dimension="0.039\" L x 0.020\" W (1.00mm x 0.50mm)", Supplier 1=DigiKey
R35: library part TNPW040243K0BYEP, "TNPW0402 43K 0.1% T-13 EP1 E3", Device Package="0402 (1005 Metric)", Manufacturer="Vishay Dale", Operating Temperature="-55°C ~ 155°C", Power (Watts)="0.063W, 1/16W", Ratings=AEC-Q200, Supplier Device Package=0402, Supplier Part Number 1=541-TNPW040243K0BYEPCT-ND, Temperature Coefficient=±10ppm/°C, Tolerance=±0.1%, ComponentLink1Description=Datasheet, ComponentLink1URL=https://www.vishay.com/docs/28758/tnpw_e3.pdf, ComponentLink2Description="DigiKey Link", ComponentLink2URL=https://www.digikey.com/en/products/detail/vishay-dale/TNPW040243K0BYEP/18881081, Composition="Thin Film", Features="Anti-Sulfur, Automotive AEC-Q200, Moisture Resistant", Height - Seated (Max)="0.016\" (0.40mm)", lastupdated="09/02/2024 8:28:21 PM", Lifecycle Status=Active, Minimum Order=1, Number of Terminations=2, Package / Case="0402 (1005 Metric)", Packaging=TapeAndReel, Part Number=TNPW040243K0BYEP, partid=84048, Price=0.25, Resistance="43 kOhms", Series="TNPW e3", Size / Dimension="0.039\" L x 0.020\" W (1.00mm x 0.50mm)", Supplier 1=DigiKey
S3 S4: "Tactile Switch SPST-NO Top Actuated Surface Mount", Package=None, Check_prices=https://www.snapeda.com/parts/434123025816/W%25C3%25BCrth+Elektronik+Midcom/view-part/?ref=eda, MF="WÃ¼rth Elektronik", MP=434123025816, SnapEDA_Link=https://www.snapeda.com/parts/434123025816/W%25C3%25BCrth+Elektronik+Midcom/view-part/?ref=snap
U1: library part TPS54302DDCR_1, "4.5-V to 28-V Input, 3-A Output, EMI Friendly Synchronous Step-Down Converter", Package="SOT-23-THN-6 Texas Instruments", Availability="In Stock", Check_prices=https://www.snapeda.com/parts/TPS54302DDCR/Texas+Instruments/view-part/?ref=eda, MF="Texas Instruments", MP=TPS54302DDCR, Price=None, SnapEDA_Link=https://www.snapeda.com/parts/TPS54302DDCR/Texas+Instruments/view-part/?ref=snap
U2: "Linear Voltage Regulator IC Positive Fixed 1 Output 1A SOT-223-3L", Package="SOT-223-3L UMW", Availability="In Stock", Check_prices=https://www.snapeda.com/parts/AMS1117-3.3/UMW/view-part/?ref=eda, MF=UMW, MP=AMS1117-3.3, Price=None, SnapEDA_Link=https://www.snapeda.com/parts/AMS1117-3.3/UMW/view-part/?ref=snap
U3: "Complete single cell Li-Ion battery with a constant current / constant voltage linear charger", Package=Package, Availability="Not in stock", Check_prices=https://www.snapeda.com/parts/TP4056/NanJing+Top+Power+ASIC+Corp./view-part/?ref=eda, MF="NanJing Top Power ASIC Corp.", MP=TP4056, Price=None, SnapEDA_Link=https://www.snapeda.com/parts/TP4056/NanJing+Top+Power+ASIC+Corp./view-part/?ref=snap
U4: "L76-L is a concurrent receiver module integrating GPS, GLONASS, Galileo and QZSS systems. With 33 tracking channels, 99 acquisition channels and 210 PRN channels, L76-L can acquire and track any mix of GPS, GLONASS and SBAS signals. Designed to be compatible with Quectel L76 module in the compact and unified form factor, L76-L provides a built-in LNA for better performance in weak signal areas.", Package="Custom Quectel", Availability="In Stock", Check_prices=https://www.snapeda.com/parts/L76L-M33/Quectel/view-part/?ref=eda, MF=Quectel, MP=L76L-M33, Price=None, Purchase-URL="https://www.snapeda.com/api/url_track_click_mouser/?unipart_id=681456&manufacturer=Quectel&part_name=L76L-M33&search_term= l76l-m33", SnapEDA_Link=https://www.snapeda.com/parts/L76L-M33/Quectel/view-part/?ref=snap
U5: "12.5V Clamp 8A (8/20Âµs) Ipp Tvs Diode Surface Mount SC-88/SC70-6/SOT-363", Package="SC-88-6 ON Semiconductor", Availability="In Stock", Check_prices=https://www.snapeda.com/parts/SMF05CT1G/Onsemi/view-part/?ref=eda, MF=onsemi, MP=SMF05CT1G, Price=None, Purchase-URL="https://www.snapeda.com/api/url_track_click_mouser/?unipart_id=7109045&manufacturer=onsemi&part_name=SMF05CT1G&search_term= smf05ct1g", SnapEDA_Link=https://www.snapeda.com/parts/SMF05CT1G/Onsemi/view-part/?ref=snap
U6: "WiFi 802.11a/b/g/n, Bluetooth v5.0 Transceiver Module 2.4GHz Antenna Not Included -", Package="NON STANDARD Espressif Systems", Availability="In Stock", Check_prices=https://www.snapeda.com/parts/ESP32-S3-WROOM-1-N8R2/Espressif+Systems/view-part/?ref=eda, MF="Espressif Systems", MP=ESP32-S3-WROOM-1-N8R2, Price=None, SnapEDA_Link=https://www.snapeda.com/parts/ESP32-S3-WROOM-1-N8R2/Espressif+Systems/view-part/?ref=snap
U7: library part CMP-06324-000015-1, "IC REG LINEAR POS ADJ 3A TO263-5", Dropout Voltage=560mV, Manufacturer="Microchip Technology", Max Junction Temp=+125°C, Max Supply Voltage=16V, Min Supply Voltage=3V, Nominal Supply Current=5-60mA, Output Current=3A, Output Voltage=1.24-15V, Package=T0263-5LD-PL-1, Temperature="-40°C to +125°C", Temperature Range Low=-40°C, Accuracy Percentage=2%, Automotive=No, Category=IC, ComponentLink2Description=Datasheet, ComponentLink2URL=http://ww1.microchip.com/downloads/en/DeviceDoc/20005897B.pdf, Device Class L1="Integrated Circuits (ICs)", Device Class L2="Power Management ICs", Device Class L3="Voltage Regulators - Linear", Digikey Description="IC REG LINEAR POS ADJ 3A TO263-5", Height=4.902mm, Lead Free=Yes, Manufacturer Part Number=MIC29302AWU-TR, Mouser Description="LDO Voltage Regulators 3A Fast-Response LDO", Number Of Outputs=1, Octopart=https://octopart.com/mic29302awu-tr-microchip-66801317, Output Type=AdjustableProgrammable, RoHS=TRUE, Standoff Height=0mm, Temperature Range High=+125°C
U8: "Module: GSM/Bluetooth; GPRS; 2G; 1800MHz, 900MHz; 85.6kbps; SMD", Package=None, Availability="In Stock", Check_prices=https://www.snapeda.com/parts/SIM800C/SIMCom/view-part/?ref=eda, MF=Simcom, MP=SIM800C, Price=None, SnapEDA_Link=https://www.snapeda.com/parts/SIM800C/SIMCom/view-part/?ref=snap
USB-C1: "USB-C (USB TYPE-C) USB 2.0 Receptacle Connector 24 (16+8 Dummy) Position Through Hole, Right Angle, low cost, 3.46mm profile, 16 pin, horizontal, Top mount", Package=None, Availability="In Stock", Check_prices=https://www.snapeda.com/parts/USB4085-GF-A/Global+Connector+Technology/view-part/?ref=eda, MF="Global Connector Technology", MP=USB4085-GF-A, Price=None, Purchase-URL="https://www.snapeda.com/api/url_track_click_mouser/?unipart_id=2780390&manufacturer=Global Connector Technology&part_name=USB4085-GF-A&search_term=usb4085-gf-a", SnapEDA_Link=https://www.snapeda.com/parts/USB4085-GF-A/Global+Connector+Technology/view-part/?ref=snap
USBLC1: "17V Clamp 5A (8/20Âµs) Ipp Tvs Diode Surface Mount SOT-23-6", Package="SOT-23-6 STMicroelectronics", Availability="In Stock", Check_prices=https://www.snapeda.com/parts/USBLC6-2SC6/STMicroelectronics/view-part/?ref=eda, MF=STMicroelectronics, MP=USBLC6-2SC6, Price=None, SnapEDA_Link=https://www.snapeda.com/parts/USBLC6-2SC6/STMicroelectronics/view-part/?ref=snap

## Via types
v1: diameter 0.4, hole 0.2, Top Layer to Bottom Layer, 24 vias
v2: diameter 1.5, hole 0.8, Top Layer to Bottom Layer, 3 vias
v3: diameter 0.6, hole 0.3, Top Layer to Bottom Layer, 3 vias
v4: diameter 0.8, hole 0.4, Top Layer to Bottom Layer, 3 vias
v5: diameter 1, hole 0.5, Top Layer to Bottom Layer, 2 vias
v6: diameter 1.27, hole 0.711, Top Layer to Bottom Layer, 2 vias

## Nets (pads, with @x,y where several pads share a name; then routed paths per layer and width w, separated by ;. In a path a pad name is that pad's centre, name@x,y a point inside that pad or via, vN(x,y) a via of type N, cw(c..) or ccw(c..) an arc to the next point about the centre after c; other vN are vias at no path point)
3V3: C1.2 C2.2 C16.1 C19.2 C23.2 C28.2 C29.2 D10.1 J1.1 R1.2 R2.2 R3.2 R6.2 R27.2 R31.2 U2.2 U4.6 U4.8 U6.2 | length 49.1
  Top Layer w0.3: U6.2@2.63,2.65 2.6,2.62 C1.2@2.6,1.1 2.75,1.1 v4(6.582,1.03) ; v4(20.74,14.5) 20.875,14.5 21.095,14.72 R6.2@27.07,14.72 ; v4(20.967,2.539) 20.967,2.667 21.215,2.915 R3.2@22.68,2.915 22.68,4.8 C2.2@22.62,4.86 ; v1(26.156,26.874) 26.156,26.847 26.34,26.663 R1.2@26.34,25.495 ; U2.2@34.425,19.5 35.33,19.5 35.44,19.39 35.69,19.39 C19.2@35.84,19.24 36.7,19.24 37.01,18.93 C16.1@39.12,18.93 ; v5(40.929,20.607) 40.795,20.473 40.213,20.473 39.12,19.38 C16.1@39.12,18.93 ; v5(42.543,20.114) 41.023,18.594 39.456,18.594 C16.1@39.12,18.93 ; U4.8@45.35,7.52 44.715,7.52 44.43,7.235 R27.2@43.04,7.235 41.415,7.235 C28.2@41.28,7.1 41.23,7.1 40.16,8.17 40.16,10.42 v1(40.96,11.22) 40.979,11.239 41.303,11.239 41.31,11.246 41.418,11.246 41.86,10.804 C29.2@41.86,9.82 41.88,9.8 43.26,9.8 C23.2@43.28,9.78 43.31,9.75 45.32,9.75 U4.6@45.35,9.72 ; R2.2@48.62,21.785 48.66,21.745 48.66,20.76 ; R31.2@48.7,19.735 48.66,19.775 48.66,20.76 ; v1(49.94,20.9) 49.8,20.76 48.66,20.76 ; v3(58.485,14.247) 58.485,14.166 58.7,13.951 D10.1@58.7,12.705
+12: C6.2 C7.2 C8.2 D1.1 F2.1 R4.2 U1.3 | length 31.5
  Top Layer w0.8: C8.2@48.46,33.36 51.3,33.36 51.48,33.18 ; C6.2@48.5,34.6 51.34,34.6 51.48,34.46 ; C7.2@48.56,31.64 48.56,28.19 D1.1@48.59,28.16 51.62,28.16 ; U1.3@49.255,39.43 51.011,39.43 51.48,38.961 51.48,34.46 ; U1.3@49.29,39.43 49.395,39.535 R4.2@49.395,40.835 ; F2.1@55.2,26.88 53.92,28.16 51.62,28.16 ; 51.48,33.18 51.48,34.46 ; 51.48,33.18 51.48,28.3 51.62,28.16
ANT_GPS: Q2.1 R30.1 U4.13 | length 15.6
  Top Layer w0.1: Q2.1@45.22,4.21 50.73,9.72 U4.13@55.05,9.72 56.32,9.72 57.08,10.48 57.08,11.294 57.08,11.565 R30.1@57.12,11.605
BOOT: C3.2 P2.1 R1.1 U6.27 | length 11.3
  Top Layer w0.1: U6.27@17.87,20.15 17.87,21.05 18.26,21.44 20.92,21.44 P2.1@21.32,21.04 24.88,24.6 C3.2@24.9,24.6 ; C3.2@24.92,24.6 25.175,24.345 R1.1@26.34,24.345
BP_1: R31.1 S4.1 U6.38 | length 71.8
  Top Layer w0.1: v1(2.72,29.3) 1.04,27.62 1.04,22.36 1.95,21.45 2.038,21.45 2.228,21.26 3.52,21.26 3.789,20.991 3.789,20.261 U6.38@3.9,20.15 ; v1(48.66,16.66) 48.697,16.697 48.697,17.175 48.7,17.177 R31.1@48.7,18.585 51.76,18.585 S4.1@52.045,18.3
  Bottom Layer w0.1: v1(2.72,29.3) 41.84,29.3 47.38,23.76 47.38,17.94 v1(48.66,16.66)
BP_2: R2.1 S3.1 U6.39 | length 65.3
  Top Layer w0.1: U6.39@2.63,20.15 2.63,20.45 2.12,20.96 2.104,20.96 1.914,21.15 1.826,21.15 0.7,22.276 0.7,28.58 v1(2.64,30.52) ; v1(48.06,24.4) 48.401,24.4 48.46,24.341 48.46,23.095 R2.1@48.62,22.935 48.675,22.88 S3.1@52.045,22.88
  Bottom Layer w0.1: v1(2.64,30.52) 41.94,30.52 v1(48.06,24.4)
CLK: R15.1 U5.4 U8.16 | length 12.2
  Top Layer w0.1: v1(16.82,38.98) 17.23,38.98 19.121,37.089 19.15,37.06 20.818,37.06 20.844,37.06 cw(c21.13,36.59) 21.061,37.136 21.096,37.14 21.111,37.14 21.13,37.14 22.33,37.14 22.343,37.14 22.354,37.14 22.376,37.138 cw(c22.33,36.59) 22.616,37.06 22.642,37.06 R15.1@24.085,37.06 ; U8.16@21.84,35.46 22.485,35.46 R15.1@24.085,37.06 ; R15.1@24.16,37.06 R15.1@24.085,37.06
  Bottom Layer w0.1: U5.4@16.73,37.85 16.82,37.94 v1(16.82,38.98)
EN: C4.2 P3.1 R3.1 U6.3 | length 23.6
  Top Layer w0.1: U6.3@3.9,2.65 4.3,1.95 4.588,1.677 4.669,1.677 6.581,1.68 ; 6.582,1.68 18.453,1.679 18.509,1.736 22.43,1.736 R3.1@22.68,1.765 24.03,1.765 C4.2@24.3,1.76 26.38,1.76 P3.1@26.78,2.16
GND: C1.1 C2.1 C3.1 C4.1 C6.1 C7.1 C8.1 C9.2 C10.1 C11.1 C13.1 C14.1 C15.1 C16.2 C17.1 C18.1 C19.1 C20.2 C21.1 C22.1 C23.1 C24.1 C25.1 C26.1 C27.1 C28.1 C29.1 C30.1 C31.1 C32.1 C33.1 C34.1 C35.2 C36.1 C37.2 C38.1 D1.2 D6.2 D7.2 D9.1 D10.2 D11.2 GSM_IPEX1.2 GSM_IPEX1.3 GSM_IPEX.2 GSM_IPEX.3 J1.3 J2.C5 J2.GND8 J2.GND9 P1.2 P2.2 P3.2 P4.2 P5.2 P6.2 Q2.3 R7.1 R9.1 R13.1 R23.1 R24.1 R34.1 R35.1 S3.2 S4.2 U1.1 U2.1 U3.1 U3.3 U3.9 U4.1 U4.10 U4.12 U5.2 U6.1 U6.40 U6.41_1 U6.41_2 U6.41_3 U6.41_4 U6.41_5 U6.41_6 U6.41_7 U6.41_8 U6.41_9 U7.3 U7.6 U8.8 U8.13 U8.19 U8.21 U8.27 U8.30 U8.31 U8.33 U8.36 U8.37 USB-C1.A1 USB-C1.A12 USB-C1.B1 USB-C1.B12 USB-C1.S1 USB-C1.S2 USB-C1.S3 USB-C1.S4 USBLC1.2 | length 59.9
  Top Layer w0.1: C34.1@1.18,42.82 1.133,42.867 1.133,44.278 1.365,44.51 GSM_IPEX.2@1.365,46.64 GSM_IPEX.3@4.315,46.64 5.34,46.64 6.08,47.38 C31.1@6.1,47.38 6.12,47.36 6.12,45.2 U8.33@6.78,44.54 ; C1.1@1.72,1.1 C1.1@1.72,1.12 ; U8.31@8.98,44.54 U8.30@10.08,44.54 10.08,45.14 10.46,45.52 C32.1@10.46,47.06 ; U8.19@21.73,38.79 22.456,38.79 22.856,38.39 25.396,38.39 26.669,37.117 28.567,37.117 29.471,36.213 v1(29.471,35.362) ; USBLC1.2@26.895,10.12 28.078,10.12 28.137,10.061 v1(28.137,10.034) ; v1(40.71,8.924) 40.767,8.867 41.048,8.867 41.06,8.855 41.143,8.855 41.228,8.94 C29.1@41.86,8.94 ; U1.1@49.255,37.53 49.255,36.825 v1(49.62,36.46) ; v1(51.982,4.822) 51.982,5.167 52.041,5.225 53.98,5.225 ; C30.1@53.96,3.16 55.08,3.16 55.645,2.595 GSM_IPEX1.2@55.645,2.02 GSM_IPEX1.3@58.595,2.02 58.68,2.105 D9.1@58.68,4.74 58.99,4.74 59.38,5.13 59.38,10.075 58.7,10.755 D10.2@58.7,10.905 57.965,10.905 57.64,10.58 v1(57.64,10.24) 57.721,10.24 57.959,10.002 57.959,9.001 C18.1@58.06,8.9 ; C33.1@53.98,4.52 53.98,5.225 ; U4.12@55.05,8.62 53.94,8.62 53.6,8.28 53.6,6.479 53.659,6.42 U4.10@55.125,6.42 ; C17.1@57.42,6.46 57.38,6.42 U4.10@55.125,6.42 ; 53.98,5.225 54.655,5.225 55.125,5.695 U4.10@55.125,6.42
  other v1: 1.133,44.247
GSM: C32.2 R29.2 U8.32 | length 4.3
  Top Layer w0.171: R29.2@7.84,47.085 7.865,47.06 C32.2@9.58,47.06 ; R29.2@7.86,47.065 7.88,47.045 U8.32@7.88,44.54
GSM_IPEX: C31.2 GSM_IPEX.1 R29.1 | length 5
  Top Layer w0.171: GSM_IPEX.1@2.845,48.245 6.085,48.245 C31.2@6.1,48.26 ; C31.2@6.12,48.3 6.205,48.215 R29.1@7.86,48.215
IPEX_GPS: C17.2 D9.2 GSM_IPEX1.1 L2.1 R20.1 | length 5.5
  Top Layer w0.171: GSM_IPEX1.1@57.12,3.545 57.12,5.069 L2.1@57.089,5.1 57.129,5.14 58.24,5.14 ; C17.2@58.275,6.225 58.3,6.2 58.3,5.2 58.24,5.14 ; R20.1@58.275,7.64 58.3,7.615 C17.2@58.3,6.46 ; D9.2@58.68,5.14 58.24,5.14
LED_1: R32.2 U6.31 | length 7
  Top Layer w0.1: U6.31@12.79,20.15 12.79,21.67 12.135,22.325 12.135,26.121 12.194,26.18 R32.2@12.865,26.18
LED_2: R17.2 U6.30 | length 4.2
  Top Layer w0.1: R17.2@12.647,23.78 12.647,22.953 14.06,21.54 U6.30@14.06,20.15
NetC5_1: C5.1 U1.6 | length 2.4
  Top Layer w0.1: U1.6@46.745,37.53 46.745,35.995 46.86,35.88 C5.1@47.58,35.88
NetC5_2: C5.2 L1.1 U1.2 | length 18.6
  Top Layer w0.1: L1.1@48.24,46.06 48.56,45.74 50.219,45.74 50.359,45.6 v1(50.44,45.6) ; C5.2@48.46,35.88 48.48,35.86 48.968,35.86 49.253,35.575 49.987,35.575 49.994,35.583 50.283,35.583 50.6,35.9 50.6,38.24 50.36,38.48 U1.2@49.255,38.48
  Bottom Layer w0.1: v1(50.34,35.64) 50.34,35.721 50.44,35.821 50.44,36.028 50.505,36.093 50.505,36.827 50.44,36.892 v1(50.44,45.6)
NetC12_1: C12.1 R5.1 R8.2 | length 4.2
  Top Layer w0.1: R5.1@44.85,38.76 44.75,38.86 R8.2@44.75,40.2 44.825,40.2 45.075,40.45 45.075,40.525 45.68,41.13 45.68,41.76 45.74,41.82 C12.1@46.38,41.82
NetC12_2: C12.2 U1.4 | length 1.7
  Top Layer w0.1: C12.2@46.38,40.94 46.38,39.675 46.625,39.43 U1.4@46.745,39.43
NetC30_2: C30.2 C33.2 L2.2 R28.1 | length 6.4
  Top Layer w0.1: R28.1@53.065,1.74 53.065,3.145 C30.2@53.08,3.16 53.08,4.02 ; C33.2@53.08,4.52 53.08,4.02 ; L2.2@56.231,5.1 55.534,5.1 54.384,3.95 53.15,3.95 53.08,4.02
NetD2_1: D2.1 D3.1 | length 2.7
  Bottom Layer w0.2: D2.1@41.14,14.405 41.28,14.545 D3.1@41.28,17.085
NetD2_2: D2.2 R11.2 | length 3.2
  Bottom Layer w0.2: R11.2@34.655,15.08 35.404,15.08 36.079,14.405 D2.2@37.54,14.405
NetD3_2: D3.2 R10.2 | length 3.3
  Bottom Layer w0.2: R10.2@34.675,16.385 35.845,16.385 36.545,17.085 D3.2@37.68,17.085
NetD6_1: D6.1 R6.1 | length 2.5
  Top Layer w0.1: R6.1@28.82,14.72 31.28,14.72 D6.1@31.32,14.76
NetD7_1: D7.1 R17.1 | length 1.9